# Altium PCB PCB-Thermostat.PcbDoc (part 3 of 5)
Units mm, origin at the board's own origin, x right, y up, seen from the top; angles counter-clockwise.
Board outline 100 x 90 mm, 4 copper layers (Top, PWR, GND, Bottom), stack 1.585 mm thick; 187 components, 164 nets, 696 pads, 417 vias.
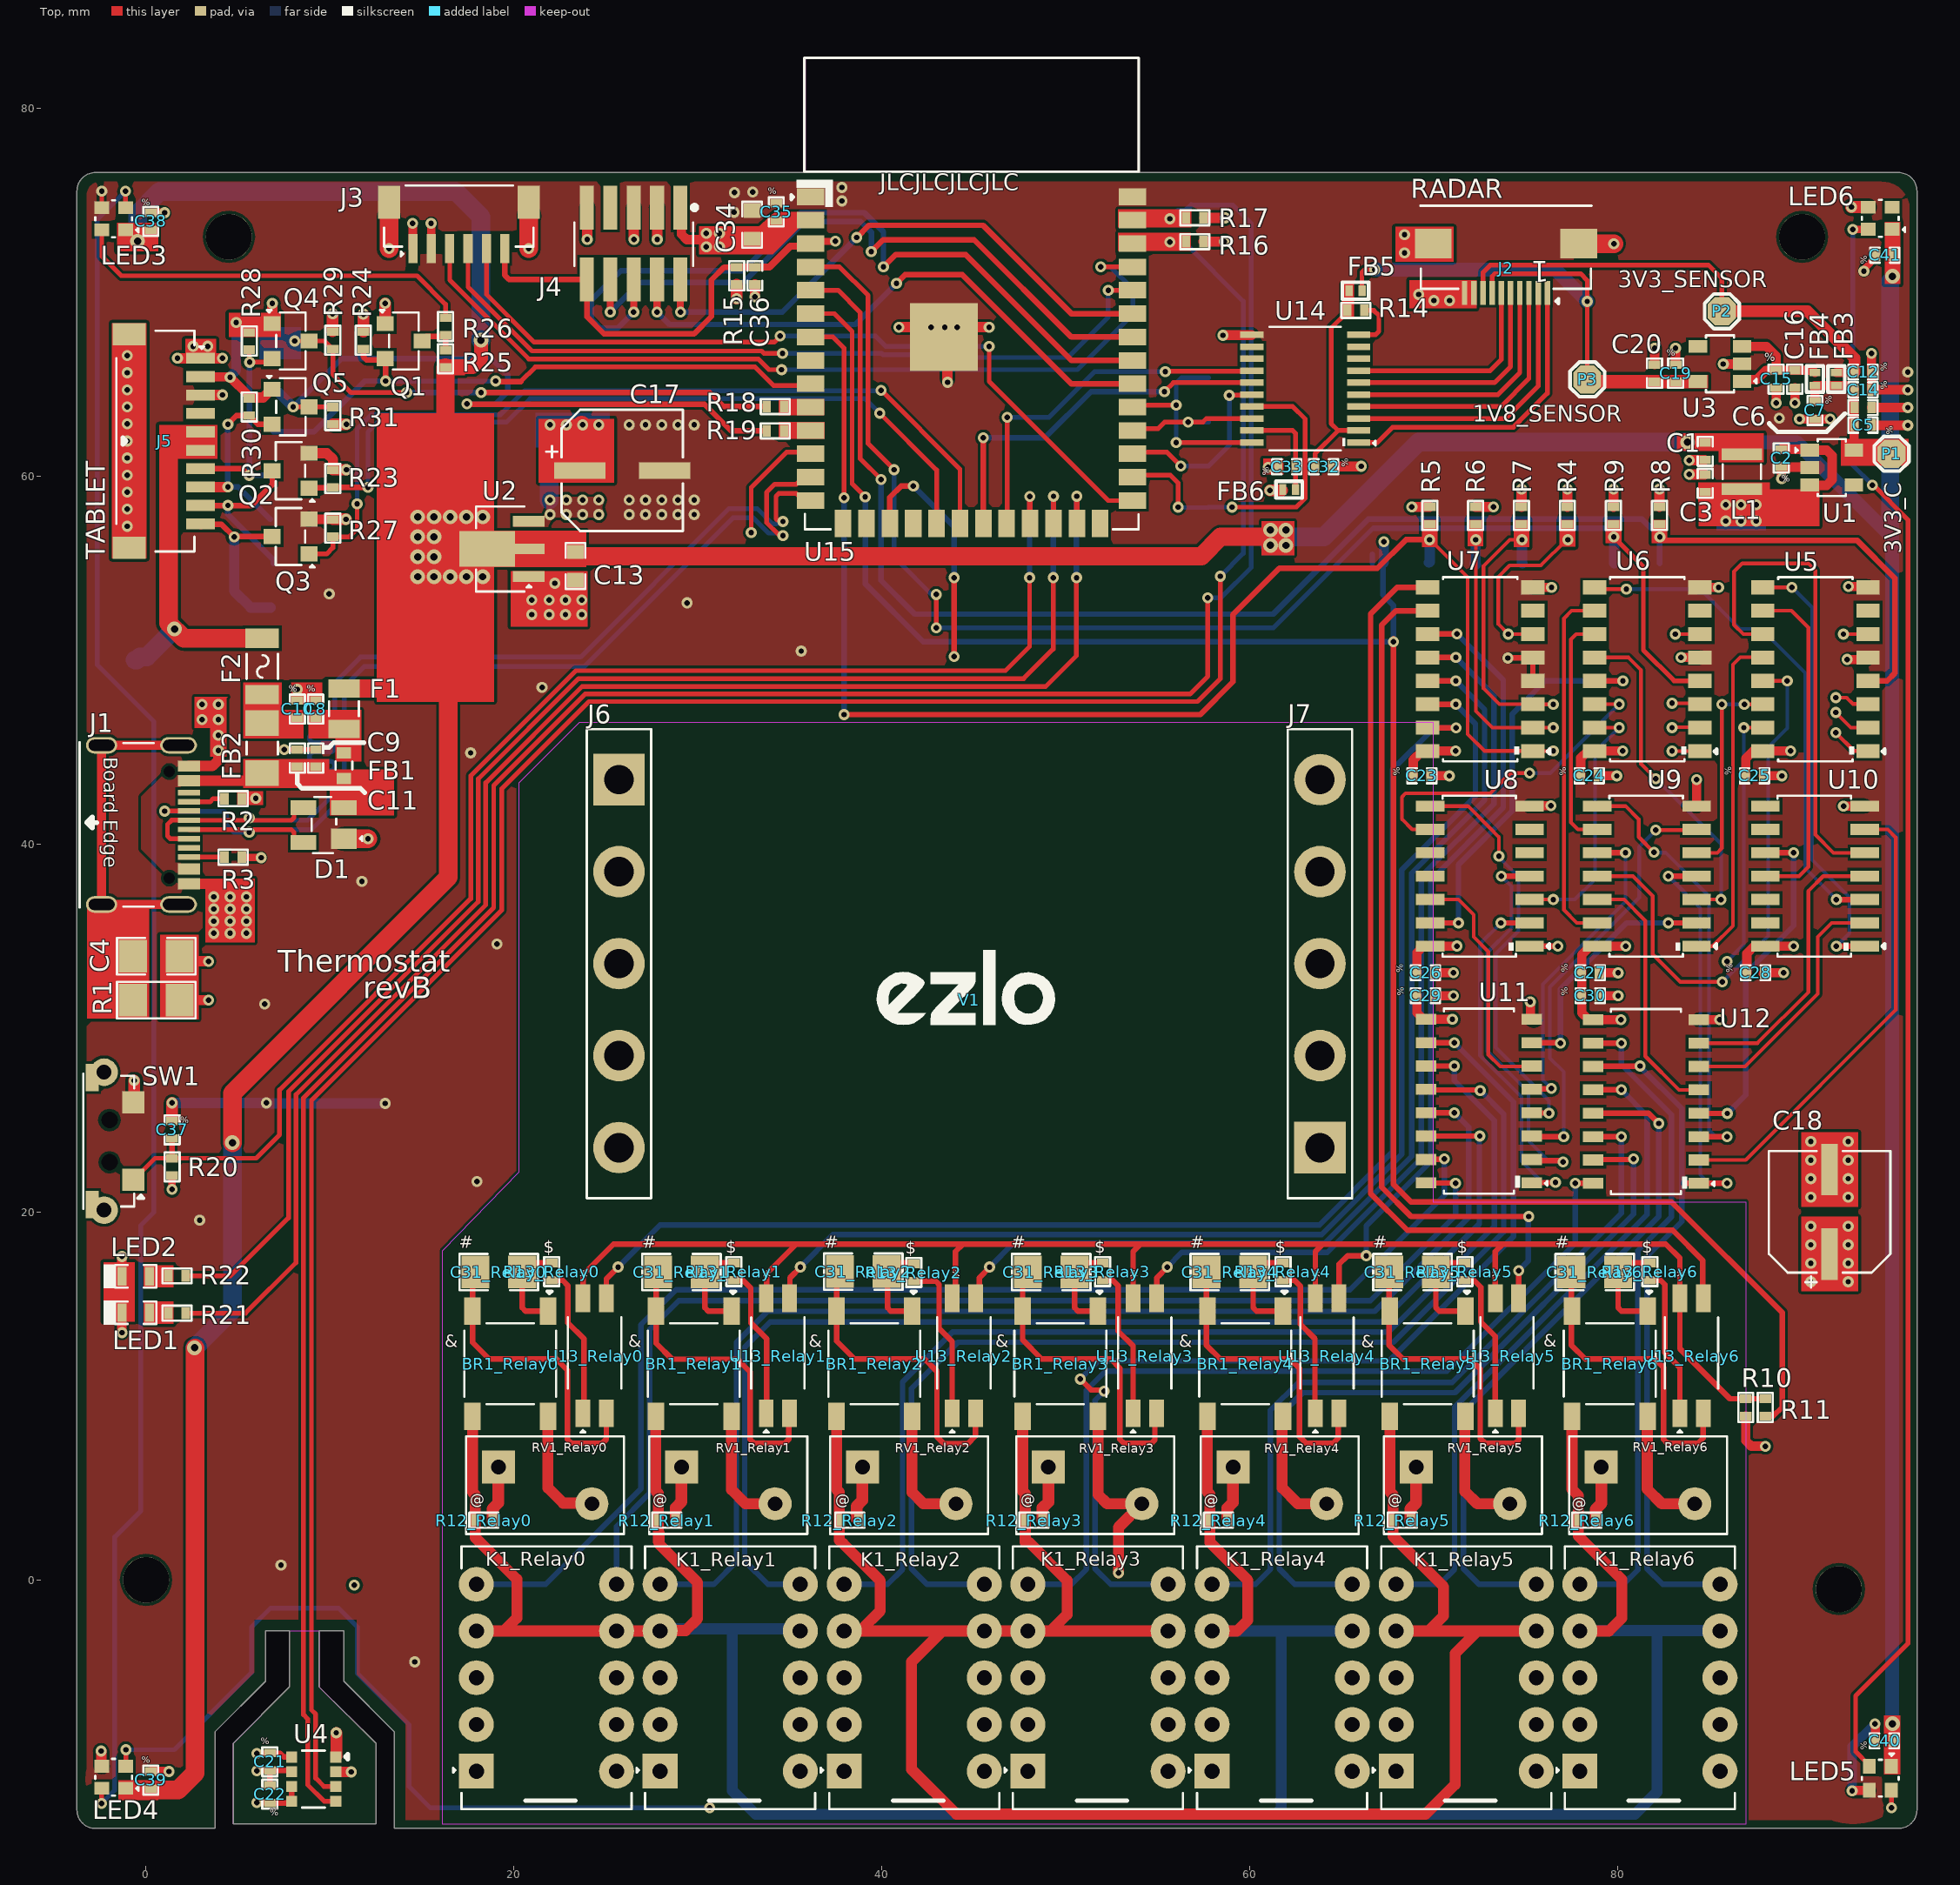
[diagram p0: Top view]

## Via types
v1: diameter 0.6, hole 0.3, Top to Bottom, 391 vias
v2: diameter 0.8, hole 0.4, Top to Bottom, 26 vias

## Nets (pads, with @x,y where several pads share a name; then routed paths per layer and width w, separated by ;. In a path a pad name is that pad's centre, name@x,y a point inside that pad or via, vN(x,y) a via of type N, cw(c..) or ccw(c..) an arc to the next point about the centre after c; other vN are vias at no path point) (continued)
+1V8: (continued)
  Top w0.508: J5.2@2.961,65.409 2.976,65.394 v1@4.557,65.394 ; v1@4.59,65.362 5.55,64.402 R30.2@5.55,64.254
  Top w0.559: R30.2@5.651,64.279 6.375,64.279 6.815,64.719 Q5.1@6.865,64.719 ; Q4.1@6.865,68.296 v1(6.865,69.386)
  Bottom w0.508: v1(4.572,65.38) 4.572,65.404 4.902,65.735 v1(4.902,68.351)
  Bottom w0.559: P19.1@6.857,69.394 v1(6.865,69.386)